# Altium PCB Board3ph.PcbDoc (part 1 of 4)
Units mil, origin at the board's own origin, x right, y up, seen from the top; angles counter-clockwise.
Board outline 2522.05 x 3126.78 mil, 4 copper layers (Top Layer, Mid Layer, Mid Layer 2, Bottom Layer), stack 61.653 mil thick; 132 components, 105 nets, 468 pads, 161 vias.
Unrouted connection lines stored in the file: 3.
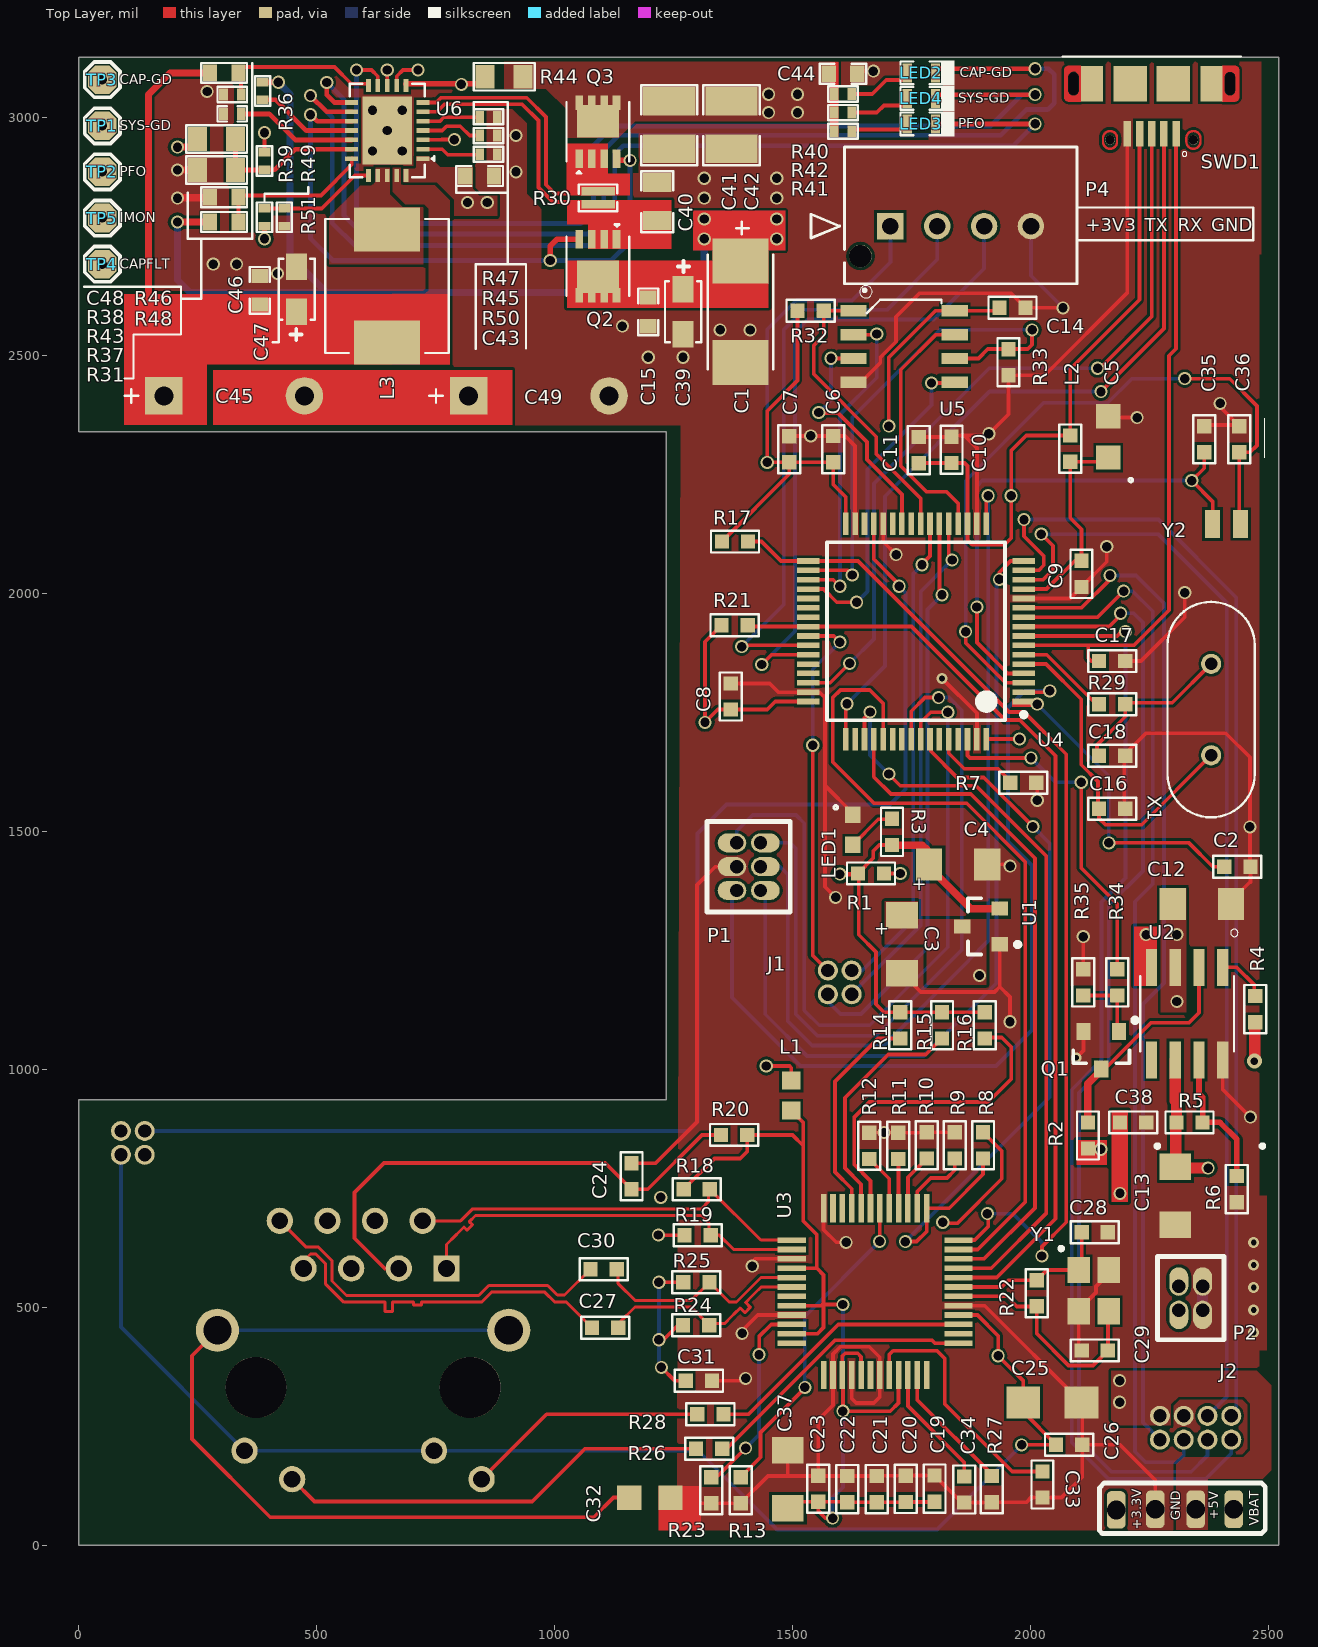
[diagram p0: Top Layer view]
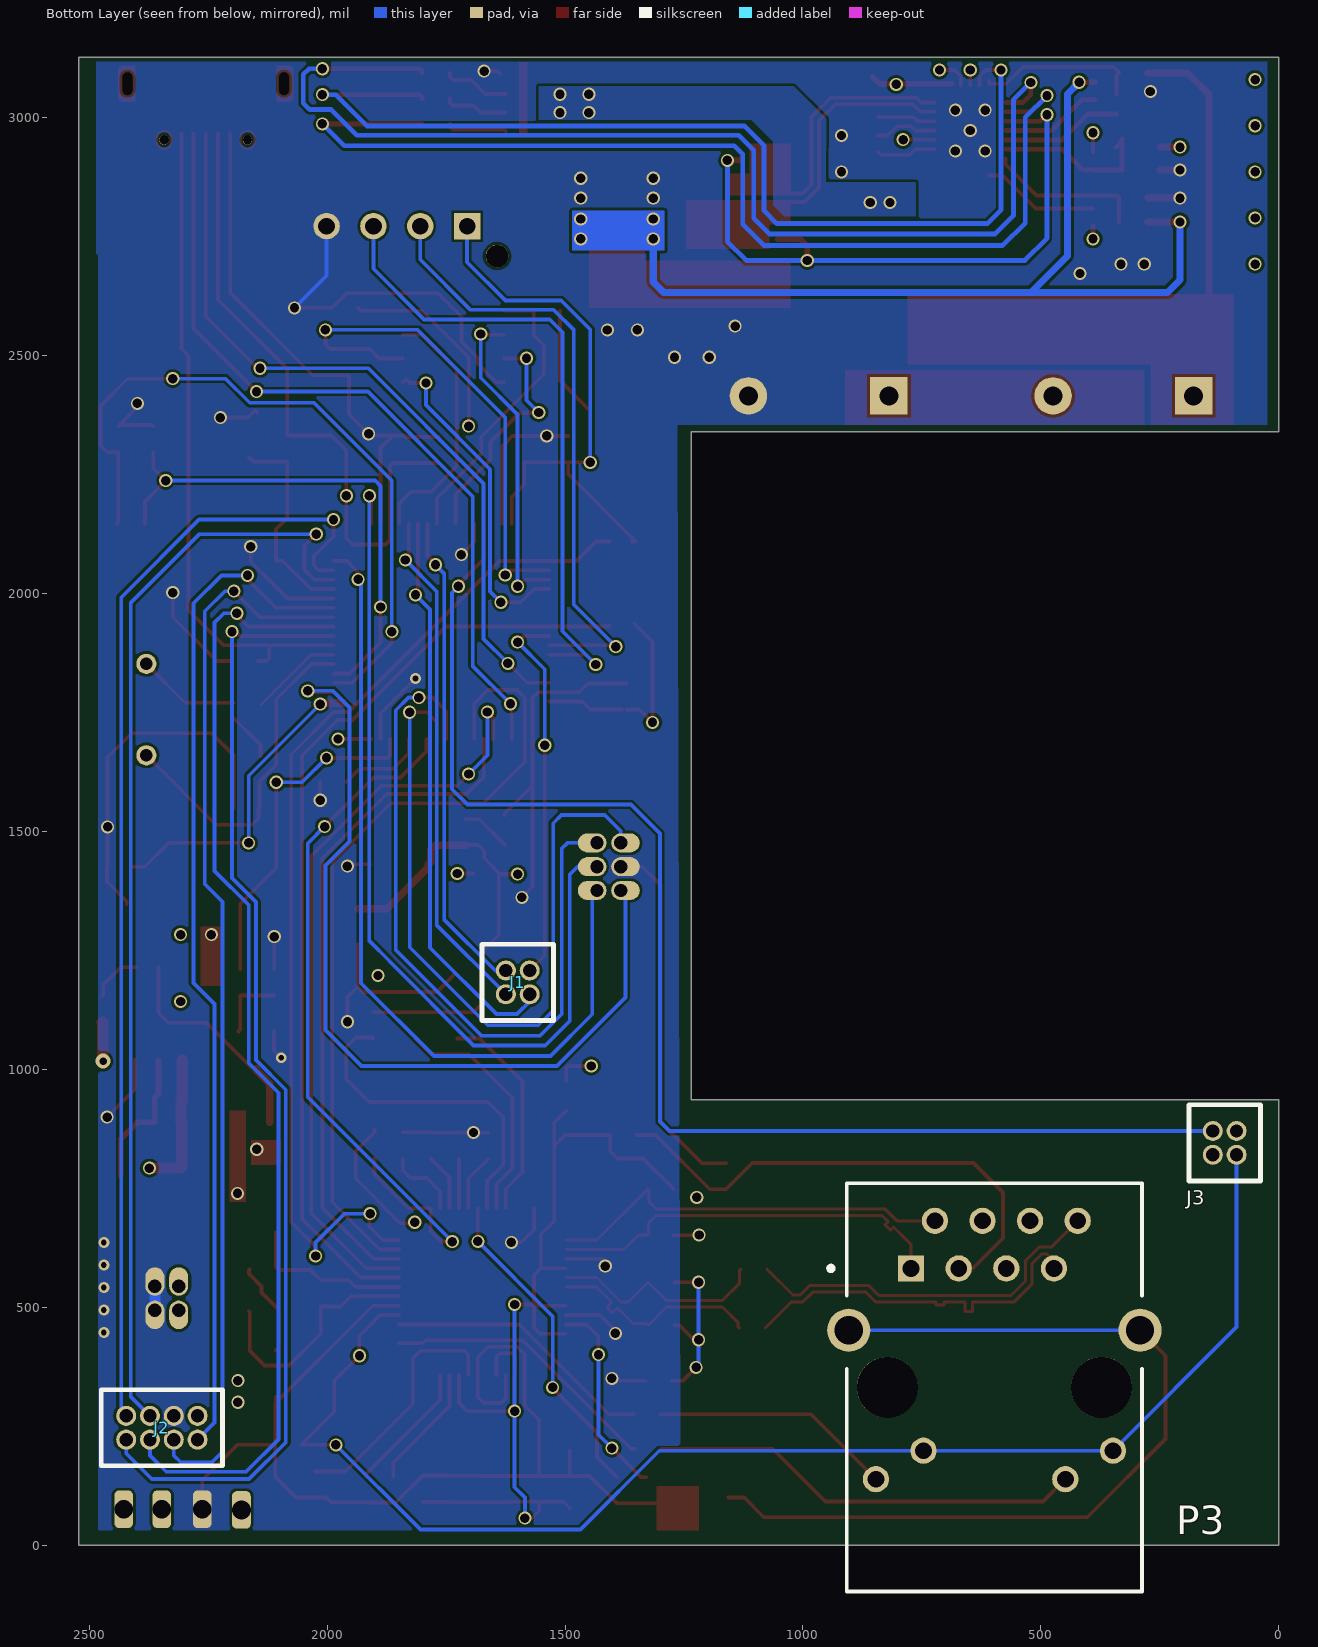
[diagram p1: Bottom Layer view, seen from below]
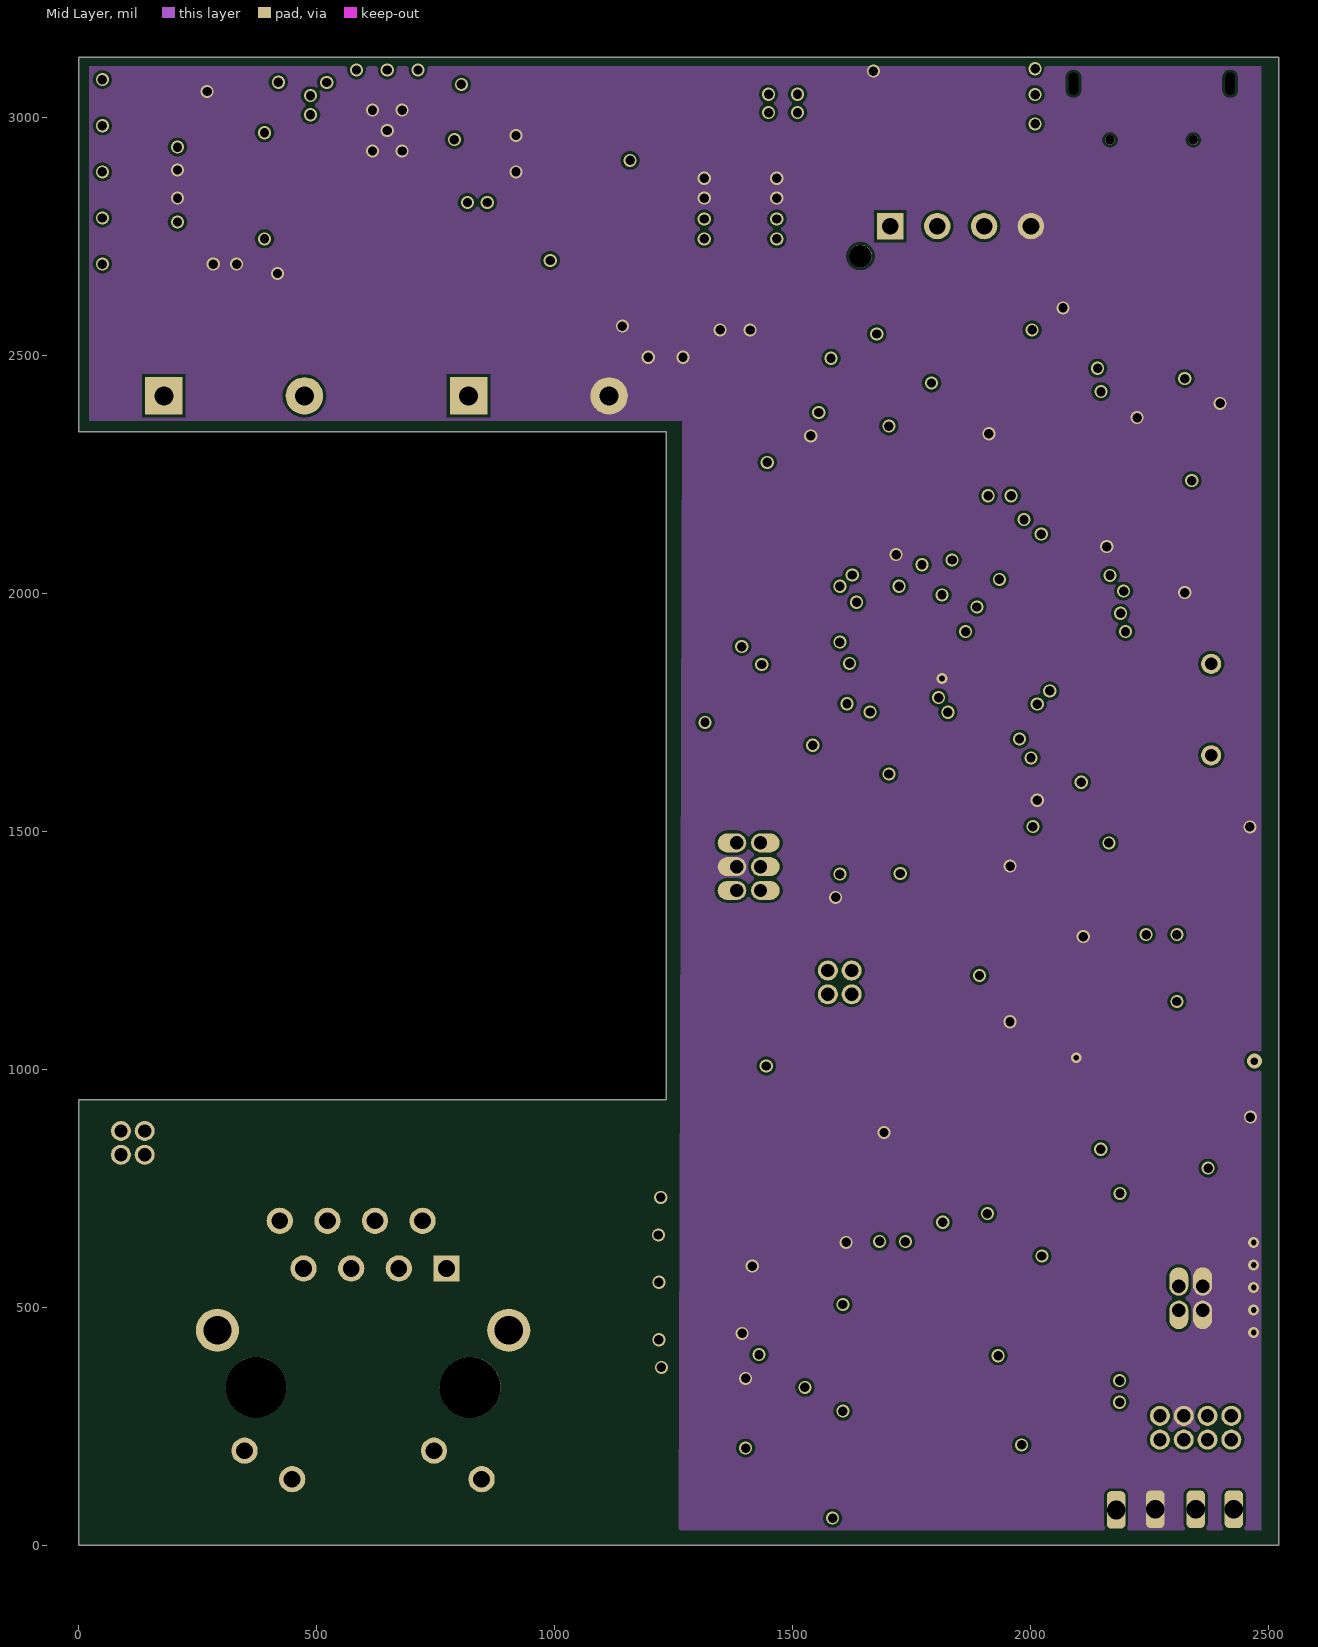
[diagram p2: Mid Layer]
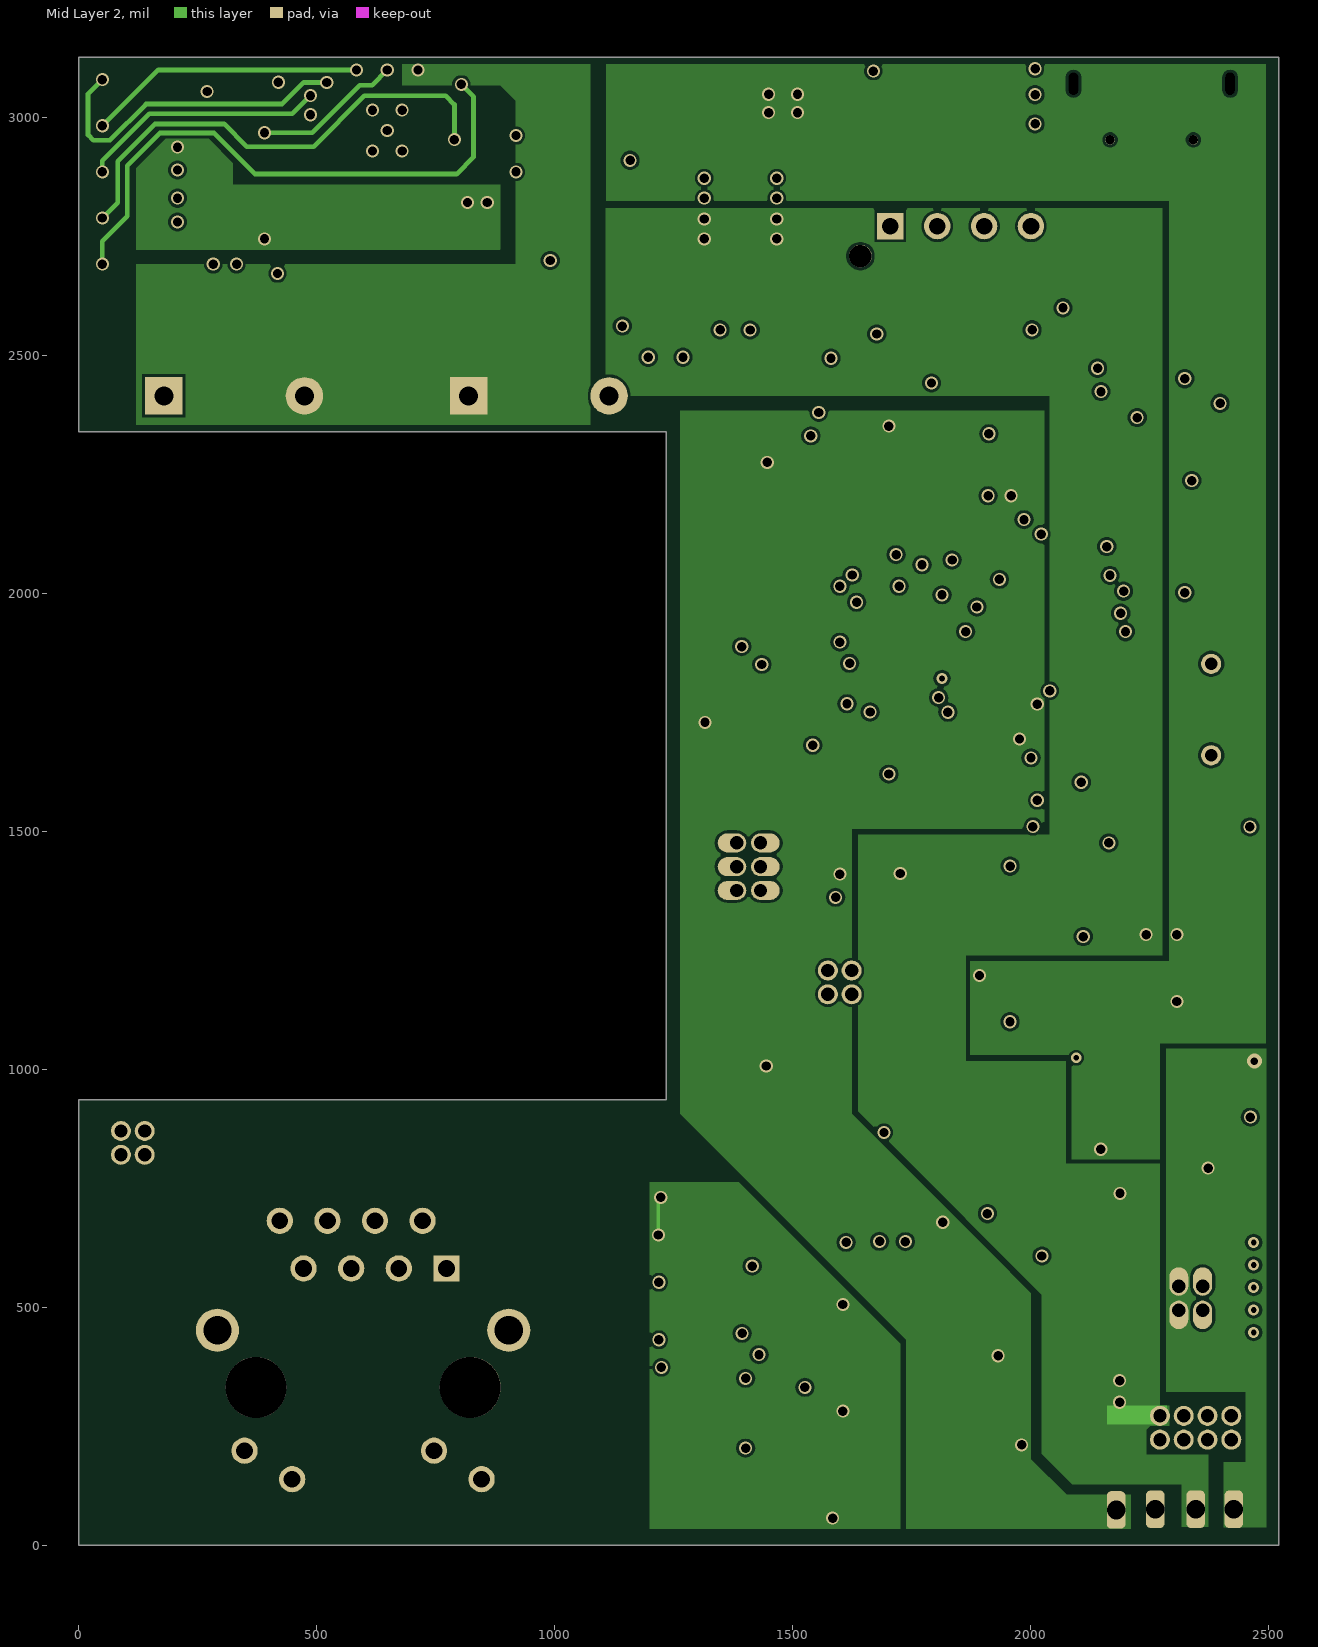
[diagram p3: Mid Layer 2]

## Layer stack, top to bottom
Top Solder: solder mask 0.4, Solder Resist, Dk 3.5
Top Layer: signal copper 1.378
Dielectric 1: prepreg 7.992, FR-4, Dk 4.2
Mid Layer: signal copper 1.181
Dielectric 3: core 40.551, Dk 4.2
Mid Layer 2: signal copper 1.181
Dielectric 2: core 7.992, Dk 4.2
Bottom Layer: signal copper 1.378
Bottom Solder: solder mask 0.4, Solder Resist, Dk 3.5

## Board outline
0,-0.01 0,935.87 1235.04,935.87 1235.04,2339.37 0.79,2339.37 0.79,3126.77 2522.05,3126.77 2522.05,-0.01

## Design rules (kind name [scope] priority, off if disabled: settings)
BoardOutlineClearance [All] p1: gap=10 ignorepadtopadclearanceinfootprint=FALSE except(0: Arc-SplitContinuation Track-OutlineEdge Track-CavityEdge Track-CutoutEdge Track-SplitBarrior Track-SplitContinuation SMDPad-SplitContinuation THPad-SplitContinuation Via-SplitContinuation Fill-SplitContinuation Poly-SplitContinuation Region-SplitContinuation Text-OutlineEdge Text-CavityEdge Text-CutoutEdge Text-SplitBarrior Text-SplitContinuation; 7: Fill-OutlineEdge)
Clearance "Stitching GND" [IsStitchingVia and InNet('GND') vs (IsVia and (Not IsStitchingVia)) Or IsPad] p1: gap=5 ignorepadtopadclearanceinfootprint=FALSE
Clearance [All] p2: gap=5.91 ignorepadtopadclearanceinfootprint=FALSE except(5: Arc-Arc Arc-Track Track-Track)
DiffPairsRouting Differential [All] p1: maxlimit=118.11 minlimit=5 mostfreqgap=10 toplayer_mingap=7.86 toplayer_maxgap=7.86 toplayer_prefgap=7.86 toplayer_minwidth=6.3 toplayer_maxwidth=6.3 toplayer_prefwidth=6.3 midlayer1_minwidth=15 midlayer1_maxwidth=15 midlayer1_prefwidth=15 midlayer2_maxgap=5 midlayer2_prefgap=5 midlayer2_minwidth=3.46 midlayer2_maxwidth=3.46 midlayer2_prefwidth=3.46 bottomlayer_maxgap=5 bottomlayer_prefgap=5 bottomlayer_minwidth=7.33 bottomlayer_maxwidth=7.33 bottomlayer_prefwidth=7.33 maxuncoupledlength=0
HoleSize [All] p1: absolutevalues=TRUE maxlimit=196.85 minlimit=1 maxpercent=80.000 minpercent=20.000
MatchedLengths MatchedLengths_Diff100 [InNetClass('Diff100')] p1: tolerance=3.94 checknetsindiffpair=TRUE checkdiffpairvsdiffpair=FALSE checkxsignals=FALSE checkothers=FALSE
MinimumSolderMaskSliver [All] p1: minsoldermaskwidth=0
PolygonConnect PolygonConnect_7 [All vs IsNamedPolygon('GND_L01_P046')] p1: connectstyle=Direct reliefconductorwidth=10 reliefentries=4 polygonreliefangle="90 Angle" airgapwidth=10
PolygonConnect PolygonConnect_6 [All vs IsNamedPolygon('VCC=5V_L01_P019')] p2: connectstyle=Direct reliefconductorwidth=10 reliefentries=4 polygonreliefangle="90 Angle" airgapwidth=10
PolygonConnect PolygonConnect_5 [All vs IsNamedPolygon('VCC=5V_L01_P018')] p3: connectstyle=Direct reliefconductorwidth=10 reliefentries=4 polygonreliefangle="90 Angle" airgapwidth=10
PolygonConnect PolygonConnect_4 [All vs IsNamedPolygon('VBAT_L01_P017')] p4: connectstyle=Direct reliefconductorwidth=10 reliefentries=4 polygonreliefangle="90 Angle" airgapwidth=10
PolygonConnect PolygonConnect_3 [All vs IsNamedPolygon('VBAT_L01_P017')] p5: connectstyle=Direct reliefconductorwidth=10 reliefentries=4 polygonreliefangle="90 Angle" airgapwidth=10
PolygonConnect PolygonConnect_2 [All vs IsNamedPolygon('VBAT_L01_P017')] p6: thpad.connectstyle=Relief thpad.reliefconductorwidth=10 thpad.reliefentries=4 thpad.polygonreliefangle="90 Angle" thpad.airgapwidth=10 smdpad.connectstyle=Direct smdpad.reliefconductorwidth=10 smdpad.reliefentries=4 smdpad.polygonreliefangle="90 Angle" smdpad.airgapwidth=10 via.connectstyle=Relief via.reliefconductorwidth=10 via.reliefentries=4 via.polygonreliefangle="90 Angle" via.airgapwidth=10
PolygonConnect PolygonConnect_1 [All vs IsNamedPolygon('VBAT_L01_P017')] p7: thpad.connectstyle=Direct thpad.reliefconductorwidth=10 thpad.reliefentries=4 thpad.polygonreliefangle="90 Angle" thpad.airgapwidth=10 smdpad.connectstyle=Relief smdpad.reliefconductorwidth=10 smdpad.reliefentries=4 smdpad.polygonreliefangle="90 Angle" smdpad.airgapwidth=10 via.connectstyle=Relief via.reliefconductorwidth=10 via.reliefentries=4 via.polygonreliefangle="90 Angle" via.airgapwidth=10
PolygonConnect [All] p8: connectstyle=Direct reliefconductorwidth=10 reliefentries=4 polygonreliefangle="90 Angle" airgapwidth=10
RoutingVias [All] p1: holewidth=19.68 width=27.56 viastyle="Through Hole" minholewidth=7.87 minwidth=19.68 maxholewidth=28 maxwidth=50
SilkToSilkClearance [All] p1: silktosilkclearance=0
SilkToSolderMaskClearance [IsPad] p1: minsilkscreentomaskgap=0 clearancetoexposedcopper=TRUE
SolderMaskExpansion [All] p1: expansion=4 istentingtop=FALSE
Width [All] p1: maxlimit=39.37 minlimit=5.91 preferedwidth=7.87
25 further rules are at their usual default settings.

## Classes and differential pairs
net class Diff100: RX2_N RX2_P RX_N RX_P TX_N TX_P
differential pair RX2: +RX2_P -RX2_N
differential pair TX: +TX_P -TX_N
differential pair RX: +RX_P -RX_N

## Components (designator, comment, footprint, x,y, rotation, side; value= is the part's Value field where it differs from the comment)
C1 "68uF" Case-C 1390.79,2591.6 r270 top
C2 "0.1uF/16V" 0603C-TBD 2462.09,1425.91 r180 top value=100nF
C3 "10uF/10V" "C-3216(TANTAL) - INV" 1729.92,1262.99 r90 top
C4 "10uF/10V" "C-3216(TANTAL) - INV" 1848.03,1430.73 r180 top
C5 "1uF/6.3v" "C-2012 - TANT" 2163.49,2328.74 r90 top value=1uF
C6 "0.1uF/16V" 0603C-TBD 1585.83,2330.71 r270 top value=100nF
C7 "0.1uF/16V" 0603C-TBD 1493.31,2330.32 r270 top value=100nF
C8 "0.1uF/16V" 0603C-TBD 1370.47,1810.91 r270 top value=100nF
C9 "0.1uF/16V" 0603C-TBD 2107.09,2013.39 r90 top value=100nF
C10 "1uF/6.3v" 0603C-TBD 1834.25,2274.14 r90 top value=1uF
C11 "0.1uF/16V" 0603C-TBD 1765.35,2328.74 r270 top value=100nF
C12 "22uF/10V" C-3216(TANTAL)#1 2360,1347.39 r180 top
C13 "22uF/10V" C-3216(TANTAL)#1 2304.13,734.65 r90 top
C14 "0.1uF/16V" 0603C-TBD 1934.71,2599.97 r0 top value=100nF
C15 "0.1uF" Cap-0603 1196.83,2591.6 r90 top
C16 "20pF" 0603C-TBD 2199.09,1547.64 r180 top
C17 "0.1uF/16V" 0603C-TBD 2199.09,1857.87 r180 top value=100nF
C18 "20pF" 0603C-TBD 2199.09,1658.66 r180 top
C19 "0.1uF/16V" 0603C-TBD 1798.43,146.85 r270 top value=100nF
C20 "0.1uF/16V" 0603C-TBD 1738.19,146.06 r270 top value=100nF
C21 "0.1uF/16V" 0603C-TBD 1676.77,145.79 r270 top value=100nF
C22 "0.1uF/16V" 0603C-TBD 1614.96,145.79 r270 top value=100nF
C23 "0.1uF/16V" 0603C-TBD 1554.33,146.46 r270 top value=100nF
C24 "0.1uF/16V" 0603C-TBD 1161.81,803.03 r270 top value=100nF
C25 "10uF/10V" C-3216(TANTAL)#2 2046.06,300.39 r180 top
C26 "10nF" C-1608 2108.54,211.42 r180 top
C27 "6.8.nF" C-1608 1078.86,457.09 r0 top
C28 "18pF" C-1608 2162.48,657.87 r180 top
C29 "18pF" C-1608 2107.6,409.45 r0 top
C30 "6.8.nF" C-1608 1075.71,580.32 r0 top
C31 "10nF" C-1608 1330.98,346.06 r180 top
C32 "1nF/2kV" C-2012 1200.39,100.39 r180 top
C33 "4.7uF" 0603C-TBD 2025.2,100.39 r90 top
C34 "10nF" C-1608 1861.02,89.88 r90 top
C35 "9p" 0603C-TBD 2364.93,2296.46 r90 top
C36 "9p" 0603C-TBD 2438.78,2296.46 r90 top
C37 "10uF/10V" C-3216(TANTAL)#1 1490.16,138.98 r90 top
C38 "1uF/6.3v" 0603C-TBD 2188.19,888.58 r0 top value=1uF
C39 "10uF" Case-A 1270,2591.6 r270 top
C40 "2.2uF" Cap-0805 1215.83,2823 r270 top
C41 "100uF" Cap-1210 1240.83,2983.93 r90 top
C42 "100uF" Cap-1210 1371.87,2983.93 r90 top
C43 "0.1uF" Cap-0603 842.71,2877.03 r180 top
C44 "0.1uF" Cap-0603 1605.9,3092.08 r180 top
C45 "25F" DGH256Q2R7 327,2415 r0 top locked
C46 "0.1uF" Cap-0603 381,2636.89 r270 top
C47 "10uF" Case-A 458.24,2639.13 r90 top
C48 "1nF" Cap-0402 323,3007.45 r0 top
C49 "25F" DGH256Q2R7 967,2415 r0 top locked
J1 "SFMC-102-X1-XX-D" SFMC-102-X1-XX-D 1599.25,1182.76 r180 bottom
J2 "SFMC-104-X1-XX-D" SFMC-104-X1-XX-D 2346.97,247.09 r0 bottom
J3 "SFMC-102-X1-XX-D" SFMC-102-X1-XX-D 114.06,845.63 r180 bottom
L1 "GLFR1608T1R5M-LR" L-1608 1497.24,945.28 r270 top
L2 "30 OHM" 0603C-TBD 2083.35,2331.89 r270 top
L3 "2.2uH" MS0650-2R2M-C 648,2645.91 r270 top
LED1 "POWER" LED-1608 1626.38,1503.15 r90 top
LED2 "Yellow" LED-0603 1770.94,3093.59 r0 top
LED3 "Yellow" LED-0603 1770.94,2986.43 r0 top
LED4 "RED" LED-0603 1770.94,3040.01 r0 top
P1 "Header 3X2" "3x2A 1.27 Double Samtec" 1407.87,1425.91 r90 top locked
P2 "Header 2X2" "2x2A 1.27 Double Samtec" 2336.61,519.29 r0 top locked
P3 "Conn_WIZnet_RB1-125BAG1A_eec" WIZnet_RB1-125BAG1A_0 597.83,331.89 r180 bottom locked
P4 "2078430004" CON_2078430004_MOL 1705.66,2771.65 r180 top
Q1 "2N7002" SOT23 2148.71,1040.27 r270 top
Q2 "SIS488DN-T1-GE3" "PowerPAK® 1212-8" 1091.31,2685.24 r270 top
Q3 "SIS488DN-T1-GE3" "PowerPAK® 1212-8" 1091.31,2972.17 r90 top
R1 "0R" R-1608 1692.46,1411.65 r180 top
R2 "22K" 0603C-TBD 2120.76,888.58 r270 top
R3 "330R" 0603C-TBD 1709.06,1471.38 r90 top value=100
R4 "100K" 0603C-TBD 2472.44,1099.21 r90 top
R5 "402K" 0603C-TBD 2361.61,888.58 r180 top
R6 "100K" 0603C-TBD 2433.55,721.07 r90 top
R7 "10K" 0603C-TBD 2012.2,1601.97 r180 top
R8 "10K" 0603C-TBD 1900.39,812.99 r90 top
R9 "10K" 0603C-TBD 1840.94,812.99 r90 top
R10 "10K" 0603C-TBD 1782.28,812.99 r90 top
R11 "10K" 0603C-TBD 1722.44,811.81 r90 top
R12 "10K" 0603C-TBD 1661.42,811.93 r90 top
R13 "10K" 0603C-TBD 1391,143.31 r270 top
R14 "10k" 0603C-TBD 1726.38,1064.96 r90 top
R15 "10k" 0603C-TBD 1814.17,1064.96 r90 top
R16 "10k" 0603C-TBD 1903.94,1064.96 r90 top
R17 "10K" 0603C-TBD 1406.69,2109.06 r180 top
R18 "49R9 1%" R-1608 1326.38,748.43 r180 top
R19 "49R9 1%" R-1608 1328.23,651.57 r180 top
R20 "10R 1%" R-1608 1349.72,862.2 r0 top
R21 "10K" 0603C-TBD 1405.79,1933.07 r180 top
R22 "1M" R-1608 2013.39,557.09 r270 top
R23 "12.4K 1%" R-1608 1329.13,88.31 r90 top
R24 "49R9 1%" R-1608 1270.08,462.6 r0 top
R25 "49R9 1%" R-1608 1270.47,552.76 r0 top
R26 "330R" R-1608 1297.36,203.15 r0 top
R27 "10K" 0603C-TBD 1918.9,90.67 r90 top
R28 "330R" R-1608 1300.12,275.59 r0 top
R29 "220" 0603C-TBD 2144.09,1767.32 r0 top
R30 "10mR" RES-0306 1091.81,2831.1 r90 top
R31 "113K" Res-0603 306,2780.29 r180 top value=113kR
R32 "100k" 0603C-TBD 1510.41,2593.7 r0 top
R33 "100k" 0603C-TBD 1953.66,2513.27 r270 top
R34 "100R" 0603C-TBD 2182.23,1210.23 r270 top
R35 "4K7" 0603C-TBD 2110.92,1210.23 r270 top
R36 "6.2K" Res-0402 386.71,3055.5 r90 top value=6.2kR
R37 "38.3K" Res-0603 306,2832 r0 top
R38 "1.05MR" RES-0805 290,2954.67 r180 top
R39 "0R" Res-0402 390.71,2908.19 r90 top
R40 "1.5K" Res-0402 1605.9,3049.33 r180 top
R41 "1.5K" Res-0402 1605.9,2970.93 r180 top
R42 "1.5K" Res-0402 1605.9,3010.13 r180 top
R43 "200K" RES-0805 290,2889.69 r0 top
R44 "1.05MR" RES-0805 894.16,3085.5 r0 top
R45 "0R" Res-0402 861.16,2961.95 r180 top
R46 "1M5" Res-0603 306,3093.5 r180 top
R47 "0R" Res-0402 861.16,3001.32 r180 top
R48 "261K" Res-0402 323,3048.36 r0 top
R49 "0R" Res-0402 390.71,2790.29 r90 top
R50 "2.49K" Res-0402 861.16,2922.73 r180 top value=2.49kR
R51 "DNP" Res-0402 432.24,2790.29 r270 top
SWD1 "0475890001" MOLEX_0475890001 2254.73,3070.87 r180 top
TP1 "TEST POINT" Test-point 50,2982.5 r90 top
TP2 "TEST POINT" Test-point 50,2885.6 r90 top
TP3 "TEST POINT" Test-point 50,3079.4 r90 top
TP4 "TEST POINT" Test-point 50,2691.79 r0 top
TP5 "TEST POINT" Test-point 50,2788.69 r0 top
U1 "MCP1700T" SOT23 1896.06,1300.39 r180 top
U2 "RT9048" SOIC127P600X175-8N 2329.13,1116.93 r270 top
U3 "W5500" W5500 1673.62,533.07 r0 top
U4 "STM32L151RET6" STM-LQFP64_V 1759.45,1920.47 r180 top
U5 "MCU-M95M02-DRMN6TP(SOIC8)" SOIC8-1.27-5X4MM 1734.37,2518.7 r270 top
U6 "LTC4041EUFD#PBF" "24-QFN (4x5)" 648.62,2972.51 r180 top
X1 "8MHz" XTAL_HC49P488W43L1150T466H350 2379.53,1755.91 r270 top
Y1 "25MHz" XTAL3225 2132.68,535.04 r270 top
Y2 "CM8V-T1A-32.768KHZ-9PF-20PPM-TA-QC" XTAL_CM8V-T1A-32.768KHZ-9PF-20PPM-TA-QC 2412.2,2146.06 r0 top

## Footprints (in the part's own frame and the unit in brackets; to place one, negate y for a bottom-side part, rotate by r counter-clockwise, add the part's x,y. Pads: shape width x height; smd on the part's side, far side on the other; paste and mask are expansions set on the pad)
"2x2A 1.27 Double Samtec" [mil]
  oval 40x60 hole 28 copper offset 0,-10 mask+2: 1(-25,-25) 3(25,-25)
  oval 40x60 hole 28 copper offset 0,10 mask+2: 2(-25,25) 4(25,25)
  silkscreen extent -70,-87 70,88, body extent -50,-62 50,73, height 290
"3x2A 1.27 Double Samtec" [mil]
  oval 40x60 hole 28 copper offset 0,-10 mask+2: 1(-50,-25) 3(0,-25) 5(50,-25)
  oval 40x60 hole 28 copper offset 0,10 mask+2: 2(-50,25) 4(0,25) 6(50,25)
  silkscreen extent -95,-88 95,87, body extent -75,-62 25,73, height 290
"24-QFN (4x5)" [mm]
  rect 0.7x0.25 smd paste-100 mask+0.05: 1(-1.9,1.5) 2(-1.9,1) 3(-1.9,0.5) 4(-1.9,0) 5(-1.9,-0.5) 6(-1.9,-1) 7(-1.9,-1.5) 13(1.9,-1.5) 14(1.9,-1) 15(1.9,-0.5) 16(1.9,0) 17(1.9,0.5) 18(1.9,1) 19(1.9,1.5)
  rect 0.25x0.7 smd paste-100 mask+0.05: 8(-1,-2.4) 9(-0.5,-2.4) 10(0,-2.4) 11(0.5,-2.4) 12(1,-2.4) 20(1,2.4) 21(0.5,2.4) 22(0,2.4) 23(-0.5,2.4) 24(-1,2.4)
  rect 2.65x3.65 smd paste-100 mask+0.05: 25(0,0)
  silkscreen extent -2.51,-2.5 2,2.5, body extent -2,-2.5 2,2.5, height 0.8
0603C-TBD [mil] "CAPACITOR 0603 TBD"
  rect 30x30 smd: 1(0,0) 2(55,0)
  silkscreen extent -23,-23 78,23, body extent -4,-15 59,15, height 19
C-1608 [mil] "C-1608"
  rect 30x30 smd: 1(0,0) 2(55,0)
  silkscreen extent -23,-23 78,23, body extent -4,-15 59,15, height 19
C-2012 [mil] "C-2012"
  rect 51.18x51.18 smd: 1(-43.31,0) 2(43.31,0)
  body extent -41,-24 41,20, height 52
"C-2012 - TANT" [mil] "Condensateurs au tantale Moulé 1µF 16V 0805 (2012 métrique)"
  rect 51.18x51.18 smd: 1(-43.31,0) 2(43.31,0)
  silkscreen extent -94,-51 -87,-43, body extent -39,-25 39,25, height 47
C-3216(TANTAL)#1 [mm] "C-3216(TANTAL)"
  rect 1.4x1.7 smd: 1(-1.55,0) 2(1.55,0)
  body extent -1.7,-0.9 1.7,0.9, height 1.8
C-3216(TANTAL)#2 [mm] "C-3216(TANTAL)"
  rect 1.8x1.7 smd: 1(1.55,0) 2(-1.55,0)
  body extent -1.5,-0.95 1.9,0.85, height 1.8
"C-3216(TANTAL) - INV" [mm] "C-3216(TANTAL)"
  rect 1.4x1.7 smd: 1(1.55,0) 2(-1.55,0)
  body extent -1.7,-0.9 1.7,0.9, height 1.8
Cap-0402 [mil]
  rect 18x25 smd mask+2.36: 1(-18.5,0) 2(18.5,0)
  silkscreen extent -31,-16 31,16, body extent -20,-10 20,10, height 19
Cap-0603 [mil]
  rect 30x35 smd mask+2.36: 1(-30,0) 2(30,0)
  silkscreen extent -49,-21 49,21, body extent -32,-16 31,16, height 34
Cap-0805 [mil] "SMD 0805"
  rect 40x60 smd mask+2.76: 1(-40,0) 2(40,0)
  silkscreen extent -64,-34 64,34, body extent -39,-25 39,25, height 30
Cap-1210 [mil] "SMD 1210"
  rect 60x110 smd: 1(-50,0) 2(50,0)
  silkscreen extent -84,-59 84,59, body extent -63,-49 63,49, height 39
Case-A [mm]
  rect 1.42x1.13 smd: 1(-1.2,0) 2(1.2,0)
  silkscreen extent -2.72,-0.97 1.63,0.97, body extent -1.6,-0.9 1.6,0.9, height 1.8
Case-C [mm]
  rect 2.4x3 smd: 1(-2.7,0) 2(2.7,0)
  silkscreen extent -4.8,-1.75 3.05,1.75, body extent -3.1,-1.67 3.1,1.68, height 2.46
CON_2078430004_MOL [mm]
  rect 1.408x1.408 hole 0.889 mask+0.076: 1(0,0)
  round 1.408 hole 0.889 mask+0.076: 2(-2.5,0) 3(-5,0) 4(-7.5,0)
  round 1.2 hole 1.194 unplated mask+0.076: 5(1.6,1.6)
  silkscreen extent -9.95,-4.22 4.23,3.08, body extent -10,-4.5 2.41,3.09, height 12.65
DGH256Q2R7 [mm]
  rect 2x2 hole 1.02: 1(-3.75,0)
  round 2 hole 1.02: 2(3.75,0)
  silkscreen extent -5.85,-0.37 -5.12,0.37, body extent -7.99,-27 7.99,0.4, height 16.5
L-1608 [mm] "L-1608"
  rect 0.95x1 smd: 1(-0.8,0) 2(0.8,0)
  body extent -0.87,-0.47 0.88,0.48, height 1
LED-0603 [mm]
  rect 0.5x1 smd: 1(-0.75,0) 2(0.75,0)
  silkscreen extent -1.12,-0.66 1.75,0.66, body extent -0.82,-0.37 0.82,0.36, height 0.68
LED-1608 [mil] "LED-1608"
  rect 35.04x32.28 smd: 1(-31.5,0) 2(31.5,0)
  silkscreen extent 43,31 51,39, body extent -36,-13 29,16, height 27
MOLEX_0475890001 [mm]
  rect 0.4x1.35 smd: 1(-1.3,2.675) 2(-0.65,2.675) 3(0,2.675) 4(0.65,2.675) 5(1.3,2.675)
  rect 1.175x1.9 smd: 6(-3.187,0) 9(3.187,0)
  rect 1.8x1.9 smd: 7(-1.15,0) 8(1.15,0)
  rect 0.4x1 hole 1.2 slot 0.5 at 0 deg unplated: None(-4.183,0) None(4.175,0)
  round 0.5 hole 0.5 unplated: None(-2.225,3) None(2.225,3)
  Top Layer region: 183 vertices and 0 holes, not listed, extent -4.675,-0.95 -3.875,0.95
  Top Layer region: -2.216,3.425 -2.199,3.424 -2.183,3.422 -2.166,3.42 -2.149,3.416 -2.133,3.412 -2.116,3.406 -2.101,3.4 -2.085,3.393 -2.07,3.386 -2.055,3.377 -2.041,3.368 -2.027,3.358 -2.014,3.347 -2.001,3.336 -1.989,3.324 -1.978,3.311 -1.967,3.298 -1.957,3.284 -1.948,3.27 -1.939,3.255 -1.932,3.24 -1.925,3.224 -1.919,3.209 -1.913,3.192 -1.909,3.176 -1.905,3.159 -1.903,3.142 -1.901,3.126 -1.9,3.109 -1.9,3 -1.8,3 -1.8,3.111 -1.801,3.133 -1.803,3.155 -1.807,3.177 -1.812,3.199 -1.817,3.221 -1.824,3.242 -1.832,3.263 -1.841,3.283 -1.851,3.303 -1.863,3.322 -1.875,3.341 -1.888,3.359 -1.902,3.376 -1.917,3.393 -1.932,3.408 -1.949,3.423 -1.966,3.437 -1.984,3.45 -2.003,3.462 -2.022,3.474 -2.042,3.484 -2.062,3.493 -2.083,3.501 -2.104,3.508 -2.126,3.513 -2.148,3.518 -2.17,3.522 -2.192,3.524 -2.214,3.525 -2.236,3.525 -2.258,3.524 -2.28,3.522 -2.302,3.518 -2.324,3.513 -2.346,3.508 -2.367,3.501 -2.388,3.493 -2.408,3.484 -2.428,3.474 -2.447,3.463 -2.466,3.45 -2.484,3.437 -2.501,3.423 -2.518,3.408 -2.533,3.393 -2.548,3.376 -2.562,3.359 -2.575,3.341 -2.587,3.322 -2.599,3.303 -2.609,3.283 -2.618,3.263 -2.626,3.242 -2.633,3.221 -2.638,3.199 -2.643,3.177 -2.647,3.156 -2.649,3.133 -2.65,3.111 -2.65,3 -2.55,3 -2.55,3.109 -2.549,3.126 -2.547,3.142 -2.545,3.159 -2.541,3.176 -2.537,3.192 -2.531,3.209 -2.525,3.224 -2.518,3.24 -2.511,3.255 -2.502,3.27 -2.493,3.284 -2.483,3.298 -2.472,3.311 -2.461,3.324 -2.449,3.336 -2.436,3.347 -2.423,3.358 -2.409,3.368 -2.395,3.377 -2.38,3.386 -2.365,3.393 -2.349,3.4 -2.334,3.406 -2.317,3.412 -2.301,3.416 -2.284,3.42 -2.267,3.422 -2.251,3.424 -2.234,3.425
  Top Layer region: -2.214,2.475 -2.192,2.476 -2.17,2.478 -2.148,2.482 -2.126,2.487 -2.104,2.492 -2.083,2.499 -2.062,2.507 -2.042,2.516 -2.022,2.526 -2.003,2.538 -1.984,2.55 -1.966,2.563 -1.949,2.577 -1.932,2.592 -1.917,2.607 -1.902,2.624 -1.888,2.641 -1.875,2.659 -1.863,2.678 -1.851,2.697 -1.841,2.717 -1.832,2.737 -1.824,2.758 -1.817,2.779 -1.812,2.801 -1.807,2.823 -1.803,2.845 -1.801,2.867 -1.8,2.889 -1.8,3 -1.9,3 -1.9,2.891 -1.901,2.874 -1.903,2.858 -1.905,2.841 -1.909,2.824 -1.913,2.808 -1.919,2.791 -1.925,2.776 -1.932,2.76 -1.939,2.745 -1.948,2.73 -1.957,2.716 -1.967,2.702 -1.978,2.689 -1.989,2.676 -2.001,2.664 -2.014,2.653 -2.027,2.642 -2.041,2.632 -2.055,2.623 -2.07,2.614 -2.085,2.607 -2.101,2.6 -2.116,2.594 -2.133,2.588 -2.149,2.584 -2.166,2.58 -2.183,2.578 -2.199,2.576 -2.216,2.575 -2.234,2.575 -2.251,2.576 -2.267,2.578 -2.284,2.58 -2.301,2.584 -2.317,2.588 -2.334,2.594 -2.349,2.6 -2.365,2.607 -2.38,2.614 -2.395,2.623 -2.409,2.632 -2.423,2.642 -2.436,2.653 -2.449,2.664 -2.461,2.676 -2.472,2.689 -2.483,2.702 -2.493,2.716 -2.502,2.73 -2.511,2.745 -2.518,2.76 -2.525,2.776 -2.531,2.791 -2.537,2.808 -2.541,2.824 -2.545,2.841 -2.547,2.858 -2.549,2.874 -2.55,2.891 -2.55,3 -2.65,3 -2.65,2.889 -2.649,2.867 -2.647,2.845 -2.643,2.823 -2.638,2.801 -2.633,2.779 -2.626,2.758 -2.618,2.737 -2.609,2.717 -2.599,2.697 -2.588,2.678 -2.575,2.659 -2.562,2.641 -2.548,2.624 -2.533,2.607 -2.518,2.592 -2.501,2.577 -2.484,2.563 -2.466,2.55 -2.447,2.538 -2.428,2.526 -2.408,2.516 -2.388,2.507 -2.367,2.499 -2.346,2.492 -2.324,2.487 -2.302,2.482 -2.281,2.478 -2.258,2.476 -2.236,2.475
  Top Layer region: 2.234,3.425 2.251,3.424 2.267,3.422 2.284,3.42 2.301,3.416 2.317,3.412 2.334,3.406 2.349,3.4 2.365,3.393 2.38,3.386 2.395,3.377 2.409,3.368 2.423,3.358 2.436,3.347 2.449,3.336 2.461,3.324 2.472,3.311 2.483,3.298 2.493,3.284 2.502,3.27 2.511,3.255 2.518,3.24 2.525,3.224 2.531,3.209 2.537,3.192 2.541,3.176 2.545,3.159 2.547,3.142 2.549,3.126 2.55,3.109 2.55,3 2.65,3 2.65,3.111 2.649,3.133 2.647,3.155 2.643,3.177 2.638,3.199 2.633,3.221 2.626,3.242 2.618,3.263 2.609,3.283 2.599,3.303 2.588,3.322 2.575,3.341 2.562,3.359 2.548,3.376 2.533,3.393 2.518,3.408 2.501,3.423 2.484,3.437 2.466,3.45 2.447,3.462 2.428,3.474 2.408,3.484 2.388,3.493 2.367,3.501 2.346,3.508 2.324,3.513 2.302,3.518 2.281,3.522 2.258,3.524 2.236,3.525 2.214,3.525 2.192,3.524 2.17,3.522 2.148,3.518 2.126,3.513 2.104,3.508 2.083,3.501 2.062,3.493 2.042,3.484 2.022,3.474 2.003,3.463 1.984,3.45 1.966,3.437 1.949,3.423 1.932,3.408 1.917,3.393 1.902,3.376 1.888,3.359 1.875,3.341 1.863,3.322 1.851,3.303 1.841,3.283 1.832,3.263 1.824,3.242 1.817,3.221 1.812,3.199 1.807,3.177 1.803,3.156 1.801,3.133 1.8,3.111 1.8,3 1.9,3 1.9,3.109 1.901,3.126 1.903,3.142 1.905,3.159 1.909,3.176 1.913,3.192 1.919,3.209 1.925,3.224 1.932,3.24 1.939,3.255 1.948,3.27 1.957,3.284 1.967,3.298 1.978,3.311 1.989,3.324 2.001,3.336 2.014,3.347 2.027,3.358 2.041,3.368 2.055,3.377 2.07,3.386 2.085,3.393 2.101,3.4 2.116,3.406 2.133,3.412 2.149,3.416 2.166,3.42 2.183,3.422 2.199,3.424 2.216,3.425
  Top Layer region: 2.236,2.475 2.258,2.476 2.28,2.478 2.302,2.482 2.324,2.487 2.346,2.492 2.367,2.499 2.388,2.507 2.408,2.516 2.428,2.526 2.447,2.538 2.466,2.55 2.484,2.563 2.501,2.577 2.518,2.592 2.533,2.607 2.548,2.624 2.562,2.641 2.575,2.659 2.587,2.678 2.599,2.697 2.609,2.717 2.618,2.737 2.626,2.758 2.633,2.779 2.638,2.801 2.643,2.823 2.647,2.845 2.649,2.867 2.65,2.889 2.65,3 2.55,3 2.55,2.891 2.549,2.874 2.547,2.858 2.545,2.841 2.541,2.824 2.537,2.808 2.531,2.791 2.525,2.776 2.518,2.76 2.511,2.745 2.502,2.73 2.493,2.716 2.483,2.702 2.472,2.689 2.461,2.676 2.449,2.664 2.436,2.653 2.423,2.642 2.409,2.632 2.395,2.623 2.38,2.614 2.365,2.607 2.349,2.6 2.334,2.594 2.317,2.588 2.301,2.584 2.284,2.58 2.267,2.578 2.251,2.576 2.234,2.575 2.216,2.575 2.199,2.576 2.183,2.578 2.166,2.58 2.149,2.584 2.133,2.588 2.116,2.594 2.101,2.6 2.085,2.607 2.07,2.614 2.055,2.623 2.041,2.632 2.027,2.642 2.014,2.653 2.001,2.664 1.989,2.676 1.978,2.689 1.967,2.702 1.957,2.716 1.948,2.73 1.939,2.745 1.932,2.76 1.925,2.776 1.919,2.791 1.913,2.808 1.909,2.824 1.905,2.841 1.903,2.858 1.901,2.874 1.9,2.891 1.9,3 1.8,3 1.8,2.889 1.801,2.867 1.803,2.845 1.807,2.823 1.812,2.801 1.817,2.779 1.824,2.758 1.832,2.737 1.841,2.717 1.851,2.697 1.863,2.678 1.875,2.659 1.888,2.641 1.902,2.624 1.917,2.607 1.932,2.592 1.949,2.577 1.966,2.563 1.984,2.55 2.003,2.538 2.022,2.526 2.042,2.516 2.062,2.507 2.083,2.499 2.104,2.492 2.126,2.487 2.148,2.482 2.17,2.478 2.192,2.476 2.214,2.475
  Top Layer region: -3.875,0.95 -3.775,0.95 -3.775,-0.95 -3.875,-0.95
  Top Layer region: 183 vertices and 0 holes, not listed, extent 3.875,-0.95 4.675,0.95
  Top Layer region: 3.875,0.95 3.775,0.95 3.775,-0.95 3.875,-0.95
  silkscreen extent -4.75,-1.45 4.75,3.88, body extent -4.32,-2.79 4.32,3.1, height 2.56
MS0650-2R2M-C [mm]
  rect 2.35x3.5 smd: 1(-3.025,0) 2(3.025,0)
  silkscreen extent -3.58,-3.3 3.57,3.3, body extent -3.57,-3.3 3.57,3.3, height 4.97
"PowerPAK® 1212-8" [mm]
  rect 0.99x0.405 smd: 1(-1.492,0.99) 2(-1.492,0.33) 3(-1.492,-0.33) 4(-1.492,-0.99)
  rect 0.76x0.405 smd: 5(1.493,-0.99) 6(1.493,-0.33) 7(1.493,0.33) 8(1.493,0.99)
  rect 1.725x2.235 smd: 9(0.5,0)
  silkscreen extent -2.29,-1.68 1.52,1.68, body extent -1.85,-1.65 1.85,1.65, height 1.06
R-1608 [mil] "R-1608"
  rect 30x30 smd: 1(0,0) 2(55,0)
  silkscreen extent -23,-23 78,23, body extent -4,-15 59,15, height 19
RES-0306 [mm]
  rect 0.45x1.8 smd: 1(-0.35,0) 2(0.35,0)
  silkscreen extent -0.71,-1.02 0.71,1.04, body extent -0.4,-0.8 0.4,0.8, height 0.5
Res-0402 [mil]
  rect 18x25 smd mask+2.17: 1(-18.5,0) 2(18.5,0)
  silkscreen extent -32,-17 32,16, body extent -23,-11 23,11, height 16
Res-0603 [mil]
  rect 30x35 smd: 1(-30,0) 2(30,0)
  silkscreen extent -48,-21 48,21, body extent -31,-17 31,17, height 18
RES-0805 [mil] "SMD 0805"
  rect 40x50 smd: 1(-40,0) 2(40,0)
  silkscreen extent -64,-29 64,29, body extent -39,-25 39,24, height 24
SFMC-102-X1-XX-D [mil] "Pitch: .050\" (1.27 mm)"
  round 42 hole 28 mask+3: 1(25,-25) 2(25,25) 3(-25,-25) 4(-25,25)
  silkscreen extent -75,-80 75,80
SFMC-104-X1-XX-D [mil] "Pitch: .050\" (1.27 mm)"
  round 42 hole 28 mask+3: 1(75,-25) 2(75,25) 3(25,-25) 4(25,25) 5(-25,-25) 6(-25,25) 7(-75,-25) 8(-75,25)
  silkscreen extent -128,-80 128,80
SOIC8-1.27-5X4MM [mm] "M95M04-DRMN6TP EEPROM"
  rect 0.6x1.4 smd: 1(-1.905,-2.7) 2(-0.635,-2.7) 3(0.635,-2.7) 4(1.905,-2.7) 5(1.905,2.7) 6(0.635,2.7) 7(-0.635,2.7) 8(-1.905,2.7)
  silkscreen extent -3.25,-2.36 -1.77,2, body extent -2.5,-3 2.5,3.2, height 1.75
SOIC127P600X175-8N [mm]
  rect 1.97x0.6 smd: 1(-2.475,1.905) 2(-2.475,0.635) 3(-2.475,-0.635) 4(-2.475,-1.905) 5(2.475,-1.905) 6(2.475,-0.635) 7(2.475,0.635) 8(2.475,1.905)
  silkscreen extent -4.51,-2.5 2,2.71, body extent -3.2,-2.5 3,2.5, height 1.75
SOT23 [mm]
  rect 0.9x0.762 smd: 1(-1,0.95) 2(-1,-0.95) 3(1,0)
  silkscreen extent -1.72,-1.5 0.7,1.92, body extent -0.7,-1.52 0.7,1.52, height 1.11
STM-LQFP64_V [mm] "Thin QFP, 64-Leads, Body 10x10mm, Pitch 0.5mm, ST Recommended"
  rect 1.2x0.3 smd: 1(-5.75,3.75) 2(-5.75,3.25) 3(-5.75,2.75) 4(-5.75,2.25) 5(-5.75,1.75) 6(-5.75,1.25) 7(-5.75,0.75) 8(-5.75,0.25) 9(-5.75,-0.25) 10(-5.75,-0.75) 11(-5.75,-1.25) 12(-5.75,-1.75) 13(-5.75,-2.25) 14(-5.75,-2.75) 15(-5.75,-3.25) 16(-5.75,-3.75) 33(5.75,-3.75) 34(5.75,-3.25) 35(5.75,-2.75) 36(5.75,-2.25) 37(5.75,-1.75) 38(5.75,-1.25) 39(5.75,-0.75) 40(5.75,-0.25) 41(5.75,0.25) 42(5.75,0.75) 43(5.75,1.25) 44(5.75,1.75) 45(5.75,2.25) 46(5.75,2.75) 47(5.75,3.25) 48(5.75,3.75)
  rect 0.3x1.2 smd: 17(-3.75,-5.75) 18(-3.25,-5.75) 19(-2.75,-5.75) 20(-2.25,-5.75) 21(-1.75,-5.75) 22(-1.25,-5.75) 23(-0.75,-5.75) 24(-0.25,-5.75) 25(0.25,-5.75) 26(0.75,-5.75) 27(1.25,-5.75) 28(1.75,-5.75) 29(2.25,-5.75) 30(2.75,-5.75) 31(3.25,-5.75) 32(3.75,-5.75) 49(3.75,5.75) 50(3.25,5.75) 51(2.75,5.75) 52(2.25,5.75) 53(1.75,5.75) 54(1.25,5.75) 55(0.75,5.75) 56(0.25,5.75) 57(-0.25,5.75) 58(-0.75,5.75) 59(-1.25,5.75) 60(-1.75,5.75) 61(-2.25,5.75) 62(-2.75,5.75) 63(-3.25,5.75) 64(-3.75,5.75)
  silkscreen extent -5.87,-4.75 4.75,4.75, body extent -5,-5 5,5, height 1.6
Test-point [mil]
  oct 60x60 smd: 1(0,0)
  silkscreen extent -37,-37 37,37
W5500 [mil] "W5500"
  rect 59.06x11.81 smd: 1(-175.2,108.27) 2(-175.2,88.58) 3(-175.2,68.9) 4(-175.2,49.21) 5(-175.2,29.53) 6(-175.2,9.84) 7(-175.2,-9.84) 8(-175.2,-29.53) 9(-175.2,-49.21) 10(-175.2,-68.9) 11(-175.2,-88.58) 12(-175.2,-108.27) 25(175.2,-108.27) 26(175.2,-88.58) 27(175.2,-68.9) 28(175.2,-49.21) 29(175.2,-29.53) 30(175.2,-9.84) 31(175.2,9.84) 32(175.2,29.53) 33(175.2,49.21) 34(175.2,68.9) 35(175.2,88.58) 36(175.2,108.27)
  rect 11.81x59.06 smd: 13(-108.27,-175.2) 14(-88.58,-175.2) 15(-68.9,-175.2) 16(-49.21,-175.2) 17(-29.53,-175.2) 18(-9.84,-175.2) 19(9.84,-175.2) 20(29.53,-175.2) 21(49.21,-175.2) 22(68.9,-175.2) 23(88.58,-175.2) 24(108.27,-175.2) 37(108.27,175.2) 38(88.58,175.2) 39(68.9,175.2) 40(49.21,175.2) 41(29.53,175.2) 42(9.84,175.2) 43(-9.84,175.2) 44(-29.53,175.2) 45(-49.21,175.2) 46(-68.9,175.2) 47(-88.58,175.2) 48(-108.27,175.2)
  body extent -177,-177 177,177, height 61
WIZnet_RB1-125BAG1A_0 [mm]
  round 2.3 hole 1.5 paste-2539.97 mask+0: 1(-7.775,3.05) 2(7.775,3.05)
  round 1.4 hole 0.9 paste-2539.97 mask+0: L1(6.325,-3.38) L2(3.785,-4.9) L3(-3.785,-3.38) L4(-6.325,-4.9) R2(-3.175,8.89) R3(-1.905,6.35) R4(-0.635,8.89) R5(0.635,6.35) R6(1.905,8.89) R7(3.175,6.35) R8(4.445,8.89)
  rect 1.4x1.4 hole 0.9 paste-2539.97 mask+0: R1(-4.445,6.35)
  round 3.25 hole 3.25 unplated paste-2539.97 mask+0: ""(-5.715,0) ""(5.715,0)
  silkscreen extent -8.85,-10.89 7.88,10.89, body extent -9.01,-10.7 9.01,10.6, height 14.36
XTAL3225 [mil] "XTAL3225"
  rect 55.12x47.24 smd: 1(-43.31,-31.5) 2(43.31,-31.5) 3(43.31,31.5) 4(-43.31,31.5)
  body extent -45,-41 57,41, height 22
XTAL_CM8V-T1A-32.768KHZ-9PF-20PPM-TA-QC [mm]
  rect 0.8x1.5 smd: 1(-0.75,0) 2(0.75,0)
  body extent -1,-0.6 1,0.6, height 0.35
XTAL_HC49P488W43L1150T466H350 [mm]
  round 1.08 hole 0.68: 1(-2.44,0) 2(2.44,0)
  silkscreen extent -5.75,-2.33 5.75,2.33, body extent -5.49,-2.3 5.69,2.37, height 3.63

## Part data
C1: library part TAJC686K016RNJ, "CAP TANT 68UF 10% 16V 2312", Case Code (Imperial)=2312, Case Code (Metric)=6032, Case/Package=Molded, Dielectric Material=Tantalum, ESR (Equivalent Series Resistance)=1.3R, LCSC Part Number=C7220, Leakage Current=10.9uA, Manufacturer="Kyocera AVX", Max Operating Temperature=125°C, Min Operating Temperature=-55°C, Package Quantity=1, Tolerance=10%, Voltage=16V, Voltage Rating (DC)=16.3V, ComponentLink1Description=https://datasheet.ciiva.com/11794/0900766b802e69d0-11794413.pdf?src-supplier=Rs, ComponentLink1URL=https://datasheet.ciiva.com/11794/0900766b802e69d0-11794413.pdf?src-supplier=Rs, ComponentLink2Description=https://datasheet.ciiva.com/7864/1680476-7864538.pdf?src-supplier=Element14, ComponentLink2URL=https://datasheet.ciiva.com/7864/1680476-7864538.pdf?src-supplier=Element14, ComponentLink3Description=https://datasheet.ciiva.com/7864/1680476-7864539.pdf?src-supplier=Element14, ComponentLink3URL=https://datasheet.ciiva.com/7864/1680476-7864539.pdf?src-supplier=Element14, ComponentLink4Description=https://datasheet.ciiva.com/7864/1680476-7864537.pdf?src-supplier=Element14, ComponentLink4URL=https://datasheet.ciiva.com/7864/1680476-7864537.pdf?src-supplier=Element14, ComponentLink5Description=https://datasheet.ciiva.com/28577/taj-28577855.pdf?src-supplier=Element14, ComponentLink5URL=https://datasheet.ciiva.com/28577/taj-28577855.pdf?src-supplier=Element14, ComponentLink6Description=https://datasheet.ciiva.com/264/taj-264443.pdf?src-supplier=Digikey, ComponentLink6URL=https://datasheet.ciiva.com/264/taj-264443.pdf?src-supplier=Digikey, ComponentLink7Description=https://datasheet.ciiva.com/264/taj-264442.pdf?src-supplier=Digikey, ComponentLink7URL=https://datasheet.ciiva.com/264/taj-264442.pdf?src-supplier=Digikey, ComponentLink8Description=https://datasheet.ciiva.com/264/taj-264444.pdf?src-supplier=Digikey, ComponentLink8URL=https://datasheet.ciiva.com/264/taj-264444.pdf?src-supplier=Digikey, ComponentLink9Description=https://datasheet.ciiva.com/12883/taj-27497-12883640.pdf?src-supplier=Mouser, ComponentLink9URL=https://datasheet.ciiva.com/12883/taj-27497-12883640.pdf?src-supplier=Mouser, ComponentLink10Description=https://datasheet.ciiva.com/11225/taj-11225965.pdf?src-supplier=Avnet, ComponentLink10URL=https://datasheet.ciiva.com/11225/taj-11225965.pdf?src-supplier=Avnet, ComponentLink11Description=https://datasheet.ciiva.com/16298/taj-16298458.pdf?src-supplier=Future+Electronics, ComponentLink11URL=https://datasheet.ciiva.com/16298/taj-16298458.pdf?src-supplier=Future+Electronics, ComponentLink12Description=https://datasheet.ciiva.com/15163/getdatasheetpartid-41779-15163003.pdf?src-supplier=Verical, ComponentLink12URL=https://datasheet.ciiva.com/15163/getdatasheetpartid-41779-15163003.pdf?src-supplier=Verical, Depth=3.2mm, Dissipation Factor=6%, Features="General Purpose", Height=2.6mm, Height - Seated (Max)=0.11inch, Item Type=Capacitors, Lead Free="Lead Free", Length=6mm, Manufacturer Part Number=TAJC686K016RNJ, Mounting Technology="Surface Mount", Packaging="Tape and Reel", Pins=2, Polarity=Polar, Pricing="1=1.06, 10=0.729, 50=0.581, 100=0.5317 (USD)", Radiation Hardening=No, Reach SVHC Compliant=No, RoHS=Yes, RoHS Compliant=Yes, Series=TAJ, Stock=888, Supplier=Digikey, Termination=SMD/SMT, Voltage Rating=16V, Width=3.2mm
C2 C6 C7 C8 C9 C11 C14 C17 C19 C20 C21 C22 C23 C24: library part Cap, "CAPACITOR 0603 CERAMIC", Capacitance=100nF, Case Code (Metric)=1608, Manufacturer=Samsung, Manufacturer Part Number=CL10F104ZO8NNNC, Supplier Part Number 1=1276-1258-1-ND, Voltage Rating=16V, Category="Ceramic Capacitors", Revision="July-2002: Re-released for DXP Platform.", Supplier 1=Digi-Key
C3 C4: library part C-3216(TANTAL), "CAP TANT 10UF 10% 10V 1206  (3216)", Capacitance=10uF, Case Code (Metric)=3216, Manufacturer="Kyocera AVX", Manufacturer Part Number=TAJA106K006RNJ, Supplier Part Number 1=478-1653-1-ND, Tolerance=20%, Voltage=6.3V, Category="Tantalum Capacitors", ComponentLink1Description=supplier, ComponentLink1URL=https://www.digikey.com/product-detail/en/avx-corporation/TAJA106K010RNJ/478-1654-1-ND/564686, Supplier 1=Digi-Key
C5: library part "Cap Pol1", "Polarized Capacitor  1uF/16V TANTAL 0805", Case Code (Metric)=2012, Manufacturer="Kyocera AVX", Manufacturer Part Number=F921C105MPA, Supplier Part Number 1=478-8126-1-ND, Tolerance=20%, Voltage Rating=16V, Category="Tantalum Capacitors", Published=8-Jun-2000, Publisher="Altium Limited", Revision="July-2002: Re-released for DXP Platform.", Supplier 1=Digi-Key, Supplier Unit Price 1=$0.09899
C10 C38: library part CAP, "Capacitor 1uF 6.3V X5R 10% SMD 0603", Case Code (Metric)=1608, Dielectric=X5R, Manufacturer=Samsung, Manufacturer Part Number=CL10A105KQ8NNNC, Supplier Part Number 1=1276-1036-1-ND, Tolerance=10%, Voltage Rating=6.3V, Category="Ceramic Capacitors", Supplier 1=Digi-Key, Supplier Unit Price 1=$0.00877
C12 C13: library part 0805C-18PF-50V-C0G-JOH, "Tantalum Capacitors - Solid SMD 10V 22uF 20%  3216 -1206", Case Code (Metric)=3216, Leakage Current=2.2uA, Manufacturer="Kyocera AVX", Manufacturer Part Number=TAJA226M010RNJ, Supplier Part Number 1=478-5798-1-ND, Category="Tantalum Capacitors", Supplier 1=Digi-Key
C15 C43 C44 C46: library part CL10F104ZO8NNNC, "Multilayer Ceramic Capacitor, 0.1 uF, 16 V, -20, +80%, Y5V, 0603 [1608 Metric]", LCSC Part Number=C2762283, Manufacturer=Samsung, Supplier Part Number=1276-1258-1-ND, Voltage Rating (DC)=16V, Category="Ceramic Capacitors", ComponentLink1Description=https://datasheet.ciiva.com/16199/cl10f104zo8nnnc-16199254.pdf?src-supplier=Future+Electronics, ComponentLink1URL=https://datasheet.ciiva.com/16199/cl10f104zo8nnnc-16199254.pdf?src-supplier=Future+Electronics, ComponentLink2Description=https://datasheet.ciiva.com/25805/cl10f104zo8nnnc-25805810.pdf?src-supplier=Digikey, ComponentLink2URL=https://datasheet.ciiva.com/25805/cl10f104zo8nnnc-25805810.pdf?src-supplier=Digikey, Manufacturer Part Number=CL10F104ZO8NNNC, Material=4241ConductorMaterial, Pricing="1=0.1, 10=0.027, 50=0.018, 100=0.0153, 500=0.01076, 1000=0.00938 (USD)", RoHS=Yes, Stock=2033375, Supplier=Digikey
C16 C18: library part CAP, "Capacitor 20p 50v 0603", Case Code (Metric)=1608, Manufacturer=Samsung, Manufacturer Part Number=CL10C200JB8NNNC, Supplier Part Number 1=1276-1187-1-ND, Temperature Coefficient=300ppm/°C, Tolerance=5%, Voltage=50V, Capacitance=20pF, Category="Ceramic Capacitors", Supplier 1=Digi-Key, Supplier Unit Price 1=$0.0134
C25 C37: library part C-3216(TANTAL), "CAP TANT 10UF 10% 10V 1206  (3216)", Capacitance=10uF, Case Code (Metric)=3216, ESR (Equivalent Series Resistance)=3R, Manufacturer="Kyocera AVX", Manufacturer Part Number=TAJA106K010RNJ, Supplier Part Number 1=478-1654-1-ND, Tolerance=10%, Voltage=10V, Category="Tantalum Capacitors", ComponentLink1Description=supplier, ComponentLink1URL=https://www.digikey.com/product-detail/en/avx-corporation/TAJA106K010RNJ/478-1654-1-ND/564686, Supplier 1=Digi-Key
C26 C31 C34: library part C-1608, "Multilayer Ceramic Capacitors MLCC - SMD/SMT 16V 0.01uF 0603 X8R 5%", Manufacturer=KEMET, Manufacturer Part Number=C0603X103J4HACTU, Supplier Part Number 1=80-C0603X103J4HACTU, Supplier 1=Mouser, Supplier Unit Price 1=$0.024
C27 C30: library part C-1608, "6800pF ±10% 200V Ceramic Capacitor X7R 0603 (1608 Metric)", Capacitance=6.8nF, Case Code (Metric)=1608, Manufacturer=KEMET, Manufacturer Part Number=C0603C682K2RECAUTO, Supplier Part Number 1=399-14765-1-ND, Tolerance=10%, Category="Ceramic Capacitors", Supplier 1=Digi-Key, Supplier Unit Price 1=$0.05209
C28 C29: library part C-1608, "18pF ±5% 50V Ceramic Capacitor C0G, NP0 0603 (1608 Metric)", Case Code (Metric)=1608, Manufacturer=Samsung, Manufacturer Part Number=CL10C180JB8NNNC, Supplier Part Number 1=1276-1089-1-ND, Temperature Coefficient=300ppm/°C, Tolerance=5%, Capacitance=18pF, Category="Ceramic Capacitors", Mount="Surface Mount", Supplier 1=Digi-Key, Supplier Unit Price 1=$0.01549
C32: library part C-4520, "1000pF ±10% 1000V (1kV) Ceramic Capacitor X7R 0805 (2012 Metric)", Capacitance=1nF, Case/Package=0805, Manufacturer=KEMET, Manufacturer Part Number=C0805C102KDRACAUTO, Supplier Part Number 1=399-16643-1-ND, Tolerance=10%, Voltage Rating=1kV, Category=Capacitors, Supplier 1=Digi-Key, Supplier Unit Price 1=$0.13364
C33: library part C-2012, "CAP CER 4,7UF 10V X5R 0603", Case Code (Imperial)=0603, Dielectric=X5R, Tolerance=10%, Voltage Rating=25V, Capacitance=4.7uF, Category="Ceramic Capacitors", Supplier Unit Price 1=$0.05773
C35 C36: library part 0603C, "CAPACITOR 0603 CERAMIC  9p 50V", Capacitance=9pF, Case Code (Imperial)=0603, Case Code (Metric)=1608, Dielectric=C0G, Manufacturer=TDK, Manufacturer Part Number=CGA3E2NP01H090D080AA, Ratings=AEC-Q200, Resistor Type=Ceramic, Supplier Part Number 1=445-12433-1-ND, Category="Ceramic Capacitors", Features="High Temperature", Supplier 1=Digi-Key, Supplier Unit Price 1=$0.20
C39 C47: library part TAJA106K010RNJ, "CAP TANT 10UF 10% 10V 1206", Dielectric Material=5684ConductorMaterial, LCSC Part No=C7177, Manufacturer="Kyocera AVX", Ripple Current=158mA, Supplier Part Number=478-1654-1-ND, Voltage Rating (AC)=10V, Category="Tantalum Capacitors", ComponentLink1Description=https://datasheet.ciiva.com/11793/0900766b80ccdc61-11793042.pdf?src-supplier=Rs, ComponentLink1URL=https://datasheet.ciiva.com/11793/0900766b80ccdc61-11793042.pdf?src-supplier=Rs, ComponentLink2Description=https://datasheet.ciiva.com/7730/1826076-7730709.pdf?src-supplier=Element14, ComponentLink2URL=https://datasheet.ciiva.com/7730/1826076-7730709.pdf?src-supplier=Element14, ComponentLink3Description=https://datasheet.ciiva.com/7730/1703059-7730710.pdf?src-supplier=Element14, ComponentLink3URL=https://datasheet.ciiva.com/7730/1703059-7730710.pdf?src-supplier=Element14, ComponentLink4Description=https://datasheet.ciiva.com/7730/1826076-7730711.pdf?src-supplier=Element14, ComponentLink4URL=https://datasheet.ciiva.com/7730/1826076-7730711.pdf?src-supplier=Element14, ComponentLink5Description=https://datasheet.ciiva.com/14593/70001050-14593951.pdf?src-supplier=Allied+Electronics, ComponentLink5URL=https://datasheet.ciiva.com/14593/70001050-14593951.pdf?src-supplier=Allied+Electronics, ComponentLink6Description=https://datasheet.ciiva.com/3004/taj-3004385.pdf?src-supplier=Avnet, ComponentLink6URL=https://datasheet.ciiva.com/3004/taj-3004385.pdf?src-supplier=Avnet, ComponentLink7Description=https://datasheet.ciiva.com/3004/taj-3004386.pdf?src-supplier=Avnet, ComponentLink7URL=https://datasheet.ciiva.com/3004/taj-3004386.pdf?src-supplier=Avnet, ComponentLink8Description=https://datasheet.ciiva.com/5936/2613-5936824.pdf?src-supplier=Farnell, ComponentLink8URL=https://datasheet.ciiva.com/5936/2613-5936824.pdf?src-supplier=Farnell, ComponentLink9Description=https://datasheet.ciiva.com/12882/taj-27497-12882583.pdf?src-supplier=Mouser, ComponentLink9URL=https://datasheet.ciiva.com/12882/taj-27497-12882583.pdf?src-supplier=Mouser, ComponentLink10Description=https://datasheet.ciiva.com/263/taj-263394.pdf?src-supplier=Digikey, ComponentLink10URL=https://datasheet.ciiva.com/263/taj-263394.pdf?src-supplier=Digikey, ComponentLink11Description=https://datasheet.ciiva.com/263/taj-263395.pdf?src-supplier=Digikey, ComponentLink11URL=https://datasheet.ciiva.com/263/taj-263395.pdf?src-supplier=Digikey, ComponentLink12Description=https://datasheet.ciiva.com/263/taj-263396.pdf?src-supplier=Digikey, ComponentLink12URL=https://datasheet.ciiva.com/263/taj-263396.pdf?src-supplier=Digikey, Lead Free=5697LeadFree, Life (Hours)=2000Hour, Manufacturer Part Number=TAJA106K010RNJ, Pricing="1=0.37, 10=0.219, 50=0.158, 100=0.139, 500=0.10666, 1000=0.09657 (USD)", Q Factor=6NUMBER, RoHS=Yes, Stock=171123, Supplier=Digikey
C40: library part EMK212B7225KGHT, "CAP CER 2.2UF 16V X7R 0805", LCSC Part Number=C385899, Manufacturer="Taiyo Yuden", ComponentLink1Description=http://www.mouser.com/ds/2/396/mlcc11_hq_e-541564.pdf?src-supplier=Mouser, ComponentLink1URL=http://www.mouser.com/ds/2/396/mlcc11_hq_e-541564.pdf?src-supplier=Mouser, ComponentLink2Description=https://datasheet.octopart.com/EMK212B7225KGHT-Taiyo-Yuden-datasheet-152732874.pdf?src-supplier=Newark, ComponentLink2URL=https://datasheet.octopart.com/EMK212B7225KGHT-Taiyo-Yuden-datasheet-152732874.pdf?src-supplier=Newark, ComponentLink3Description=https://datasheet.octopart.com/EMK212B7225KGHT-Taiyo-Yuden-datasheet-97186030.pdf?src-supplier=Future+Electronics, ComponentLink3URL=https://datasheet.octopart.com/EMK212B7225KGHT-Taiyo-Yuden-datasheet-97186030.pdf?src-supplier=Future+Electronics, ComponentLink4Description="https://ds.yuden.co.jp/TYCOMPAS/ut/detail?pn=EMK212B7225KGHT  &amp;u=M&src-supplier=Digikey", ComponentLink4URL="https://ds.yuden.co.jp/TYCOMPAS/ut/detail?pn=EMK212B7225KGHT  &amp;u=M&src-supplier=Digikey", ComponentLink5Description=http://www.yuden.co.jp/productdata/catalog/en/mlcc01_hq_e.pdf?src-supplier=Digikey, ComponentLink5URL=http://www.yuden.co.jp/productdata/catalog/en/mlcc01_hq_e.pdf?src-supplier=Digikey, ComponentLink6Description=http://www.yuden.co.jp/ut/product/category/capacitor/putpdf/EMK212B7225KGHT.pdf?src-supplier=Avnet, ComponentLink6URL=http://www.yuden.co.jp/ut/product/category/capacitor/putpdf/EMK212B7225KGHT.pdf?src-supplier=Avnet, ComponentLink7Description=https://datasheet.octopart.com/EMK212B7225KGHT-Taiyo-Yuden-datasheet-154808297.pdf?src-supplier=Master+Electronics, ComponentLink7URL=https://datasheet.octopart.com/EMK212B7225KGHT-Taiyo-Yuden-datasheet-154808297.pdf?src-supplier=Master+Electronics, Halogen Free=5694HalogenFree, Item Type=Capacitors, Lead Free=5697LeadFree, Manufacturer Part Number=EMK212B7225KGHT, Material=4241ConductorMaterial, Pricing="1=0.24, 10=0.137, 50=0.097, 100=0.0847, 500=0.06374, 1000=0.05721 (USD)", RoHS=Yes, Stock=8236, Supplier=Digikey
C41 C42: library part EMK325ABJ107MM-P, "CAP CER 100UF 16V X5R 1210", Case Code (Imperial)=1210, Case Code (Metric)=3225, LCSC Part Number=C90143, Manufacturer="Taiyo Yuden", Max Operating Temperature=85°C, Min Operating Temperature=-55°C, Supplier Part Number 1=587-5426-1-ND, Tolerance=20%, Voltage Rating=16V, Case/Package=1210, Category="Ceramic Capacitors", ComponentLink1Description=http://ds.yuden.co.jp/TYCOMPAS/ut/detail.do?productNo=EMK325ABJ107MM-P&fileName=EMK325ABJ107MM-P_SS&mode=specSheetDownload&src-supplier=Digi-Key, ComponentLink1URL=http://ds.yuden.co.jp/TYCOMPAS/ut/detail.do?productNo=EMK325ABJ107MM-P&fileName=EMK325ABJ107MM-P_SS&mode=specSheetDownload&src-supplier=Digi-Key, Item Type=Capacitor, Lead Free="Lead Free", Manufacturer Part Number=EMK325ABJ107MM-P, Mounting Technology="Surface Mount", Packaging="Cut Tape", Pricing 1="1=1.75, 10=1.415, 50=1.2352, 100=1.0809, 500=0.82352 (USD)", RoHS=Yes, RoHS Compliant=Yes, Series=M, Stock 1=81344, Supplier 1=Digi-Key
C45 C49: library part DGH256Q2R7, "CAPACITOR 25F -10%, +30% 2.7V TH", Manufacturer="CDE Illinois Capacitor", ComponentLink1Description=https://www.cde.com/resources/catalogs/DGH-series.pdf?src-supplier=Digikey, ComponentLink1URL=https://www.cde.com/resources/catalogs/DGH-series.pdf?src-supplier=Digikey, Item Type=Capacitor, Manufacturer Part Number=DGH256Q2R7, Pricing="100=3.433, 4500=1.646 (USD)", RoHS=Yes, Supplier="Arrow Electronics", Supplier Part Number=DGH256Q2R7
C48: library part CC0402KRX7R8BB102, "CAP CER 1000PF 25V X7R 0402", Case Code (Imperial)=0402, Case Code (Metric)=1005, Dielectric=X7R, Insulation Resistance=10GR, LCSC Part Number=C541372, Manufacturer=Yageo, Max Operating Temperature=125°C, Min Operating Temperature=-55°C, Tolerance=10%, Voltage Rating=25V, Capacitance=1nF, Case/Package=0402, Category="Ceramic Capacitors", ComponentLink1Description=https://datasheet.ciiva.com/26862/getdatasheetpartid-639817-26862638.pdf?src-supplier=Verical, ComponentLink1URL=https://datasheet.ciiva.com/26862/getdatasheetpartid-639817-26862638.pdf?src-supplier=Verical, ComponentLink2Description=https://datasheet.ciiva.com/5425/upy-gp-np0-16v-to-50v-8-3714-5425527.pdf?src-supplier=Mouser, ComponentLink2URL=https://datasheet.ciiva.com/5425/upy-gp-np0-16v-to-50v-8-3714-5425527.pdf?src-supplier=Mouser, Depth=0.5mm, Dissipation Factor=2.5%, Halogen Free="Halogen Free", Item Type=Capacitor, Lead Free="Lead Free", Length=1mm, Manufacturer Part Number=CC0402KRX7R8BB102, Mount="Surface Mount", Number of Pins=2, Packaging="Tape and Reel", Pricing 1="1=0.00230, 10000=0.00230, 100001=0.00190 (USD)", Radiation Hardening=No, RoHS=Yes, RoHS Compliant=Yes, Series=CC, Stock 1=370000, Supplier 1="Arrow Electronics", Supplier Part Number 1=CC0402KRX7R8BB102, Termination=SMD/SMT, Thickness=0.022inch, Voltage Rating (DC)=25V, Width=0.02inch
J1 J2 J3: "Socket Strip, Cuttable, Double Row, 0.050\"x0.050\" Pitch", Manufacturer=SAMTEC, CREATED="JUNE 03,  2014 - WENDY XIN", PCB DECAL=SFMC-104-X1-XX-D, System=Connector
L1: library part L-1608, "FIXED IND 1.5UH 625MA 150 MOHM", Case Code (Metric)=1608, Current Rating=625mA, Manufacturer=TDK, Supplier Part Number 1=445-6152-1-ND, Tolerance=20%, Category="Fixed Inductors", Composition=Wirewound, Manufacturer Part Number=GLFR1608T1R5M-LR, Shielding=Shielded, Supplier 1=Digi-Key, Supplier Unit Price 1=$0.10971, Termination=SMD/SMT
L2: library part Inductor, "FERRITE BEAD 30 OHM 0603 1LN", Case Code (Metric)=1608, Manufacturer=TDK, Manufacturer Part Number=MPZ1608S300ATAH0, Supplier Part Number 1=445-1562-1-ND, Test Frequency=100MHz, Tolerance=25%, Category="Ferrite Beads and Chips", Impedance=30R, Supplier 1=Digi-Key
L3: library part MS0650-2R2M-C, "9.5A 2.2uH ±20% 16A SMD,7.15x6.6x5mm Power Inductors ROHS", LCSC Part Number=C18199494, Manufacturer=COILMX, Package=SMD,7.15x6.6x5mm, ComponentLink1Description=LCSC, ComponentLink1URL=https://www.lcsc.com/product-detail/Power-Inductors_COILMX-MS0650-2R2M-C_C18199494.html, Item Type=Inductor, Manufacturer Part Number=MS0650-2R2M-C
LED1: library part LED-1608, "LED RED CLEAR 2SMD 1.95V, 5mA", Case/Package=0603, Forward Voltage=2.2V, Manufacturer=Everlight, Manufacturer Part Number=19-217/R6C-AL1M2VY/3T, Supplier Part Number 1=1080-1585-1-ND, ComponentLink1Description=https://media.digikey.com/pdf/Data%20Sheets/Everlight%20PDFs/19-217-R6C-AL1M2VY-3T.pdf?src-supplier=Digi-Key, ComponentLink1URL=https://media.digikey.com/pdf/Data%20Sheets/Everlight%20PDFs/19-217-R6C-AL1M2VY-3T.pdf?src-supplier=Digi-Key, Supplier 1=Digi-Key
LED2 LED3: library part NCD0603Y2, "yellow 0603 Light Emitting Diodes (LED) ROHS", LCSC Part Number=C89811, Manufacturer="Foshan NationStar Optoelectronics", Package=0603, ComponentLink1Description=LCSC, ComponentLink1URL=https://www.lcsc.com/product-detail/Light-Emitting-Diodes-LED_Foshan-NationStar-Optoelectronics-NCD0603Y2_C89811.html, Item Type=LED, Manufacturer Part Number=NCD0603Y2
LED4: library part NCD0603R3, "RED LED 0603 Light Emitting Diodes", LCSC Part Number=C3151730, Manufacturer="Foshan NationStar Optoelectronics", Package=0603, ComponentLink1Description=LCSC, ComponentLink1URL=https://www.lcsc.com/product-detail/Light-Emitting-Diodes-LED_Foshan-NationStar-Optoelectronics-NCD0603R3_C3151730.html, Item Type=LED, Manufacturer Part Number=NCD0603R3
P1: "CONN HDR 6POS 0.05 STACK T/H Dual row", Manufacturer=Samtec, Manufacturer Part Number=FW-03-04-L-D-200-100, Mount=TH, Supplier 1=Samtec, Supplier Part Number 1=FW-03-04-L-D-200-100, System=Connector
P2: "CONN HDR 4POS 0.05 STACK T/H Dual row", Manufacturer=Samtec, Manufacturer Part Number=FW-02-04-L-D-200-100, Mount=TH, Supplier 1=Samtec, Supplier Part Number 1=FW-02-04-L-D-200-100, System=Connector